# Altium PCB task1.PcbDoc (part 2 of 2)
Units mil, origin at the board's own origin, x right, y up, seen from the top; angles counter-clockwise.
Board outline 13280 x 12290 mil, 2 copper layers (Top Layer, Bottom Layer); 143 components, 138 nets, 540 pads, 213 vias.
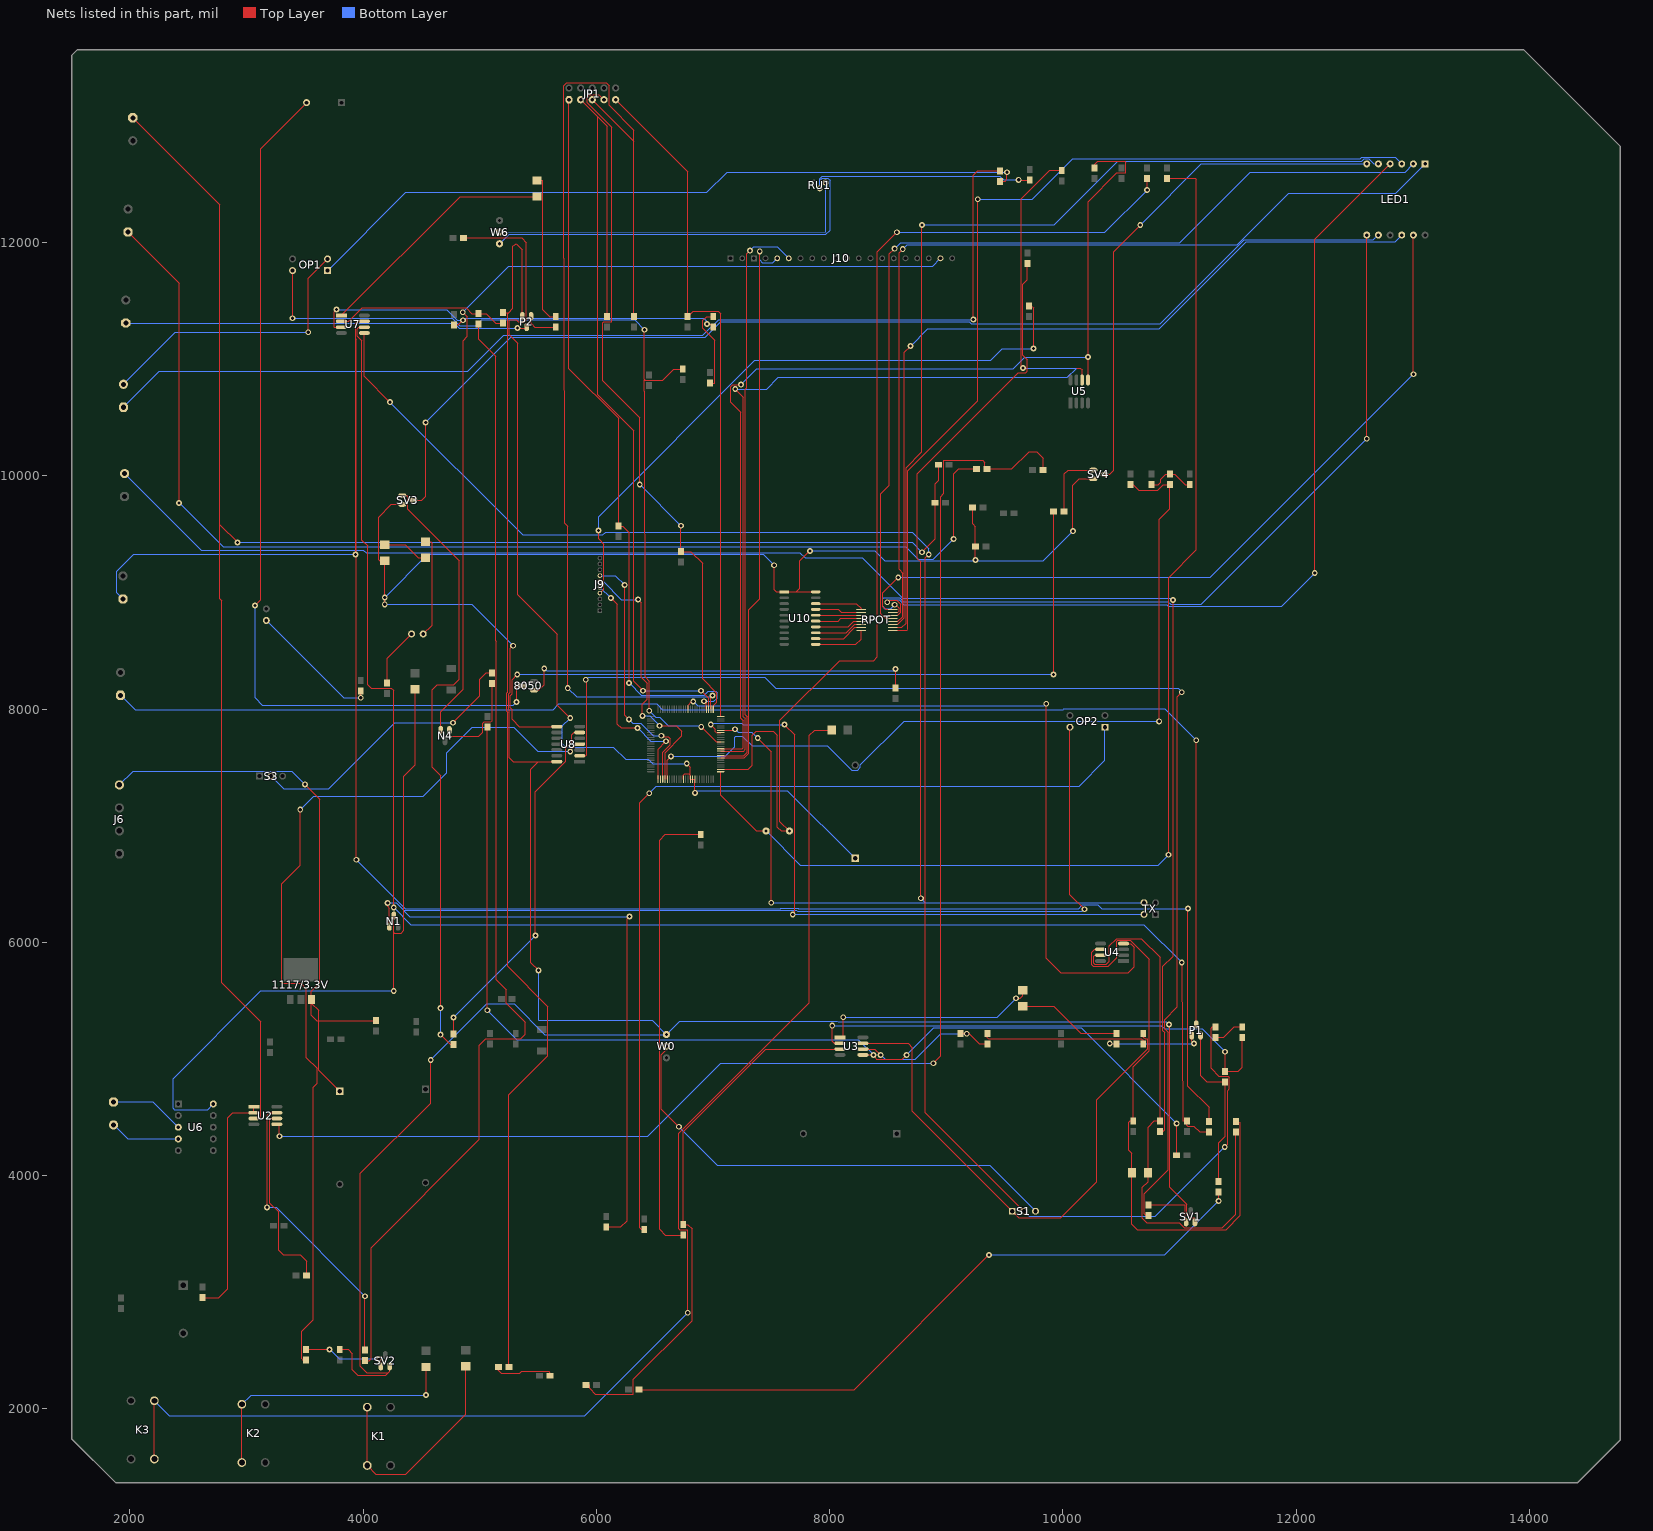
[diagram p2: the nets of this part, all layers, seen from the top]

## Via types
v1: diameter 50, hole 28, Top Layer to Bottom Layer, 213 vias

## Nets (pads, with @x,y where several pads share a name; then routed paths per layer and width w, separated by ;. In a path a pad name is that pad's centre, name@x,y a point inside that pad or via, vN(x,y) a via of type N, cw(c..) or ccw(c..) an arc to the next point about the centre after c; other vN are vias at no path point) (continued)
LED23: LED1.8 SV3.3 | length 9604.1
  Top Layer w5: SV3.3@4430,9792 4504,9792 4536,9824 v1(4536,10458)
  Bottom Layer w5: v1(4536,10458) 5266.99,11188.99 6934.84,11188.99 7067.85,11322 9195,11322 9214.54,11302.46 10834.77,11302.46 11554.81,12022.5 12662.5,12022.5 LED1.8@12705,12065
LED24: LED1.6 SV4.3 | length 4451.4
  Top Layer w5: SV4.3@10355,10012 10400,10012 10436,10048 10436,11923 v1(10663.58,12150.58)
  Bottom Layer w5: v1(10663.58,12150.58) 11188,12675 LED1.6@12605,12675
Net1117/3.3V_3: 1117/3.3V.3 C13.1 C14.1 J6.4 | length 5176.6
  Top Layer w5: v1(3501,7355) 3628,7228 3628,5652 3556.22,5580.22 1117/3.3V.3@3556.22,5511.46 1117/3.3V.3@3556.22,5479.78 ; C13.1@3800,4725 3620,4905 3620,5330 ; C14.1@4110,5330 3620,5330 ; 1117/3.3V.3@3556.22,5479.78 3556.22,5376 3602.22,5330 3620,5330 ; 1117/3.3V.3@3556.22,5479.78 3620,5416 3620,5330
  Bottom Layer w5: J6.4@1910,7350.1 2027.9,7468 3388,7468 v1(3501,7355)
Net8050_1: 8050.1 R54.2 | length 3439.4
  Top Layer w5: 8050.1@5464.81,8161.81 5504,8161.81 5553,8210.81 v1(5553,8349) ; R54.2@8565,8180 v1(8565,8344.72)
  Bottom Layer w5: v1(5553,8349) 5574.42,8327.58 8547.86,8327.58 v1(8565,8344.72)
Net8050_3: 8050.3 LS1.2 | length 7753.4
  Top Layer w5: v1(3073,8889) 3121,8937 3121,12806 LS1.2@3515,13200 ; v1(5315,8062) 5315,8188.81 5326,8199.81 8050.3@5369.81,8199.81
  Bottom Layer w5: v1(3073,8889) 3073,8096 3136,8033 5286,8033 v1(5315,8062)
Net_43: ?.43 TX.2 | length 5450.8
  Top Layer w5: v1(6980,7868) 7020,7828 7020,7808 7030.2,7797.8 ?.43@7065,7797.8 ; v1(7612,7868) 7699,7781 7699,6256 v1(7683,6240)
  Bottom Layer w5: v1(6980,7868) 6992.5,7880.5 7245,7880.5 7257.5,7868 v1(7612,7868) ; v1(7683,6240) TX.2@10695,6240
Net_44: ?.44 R27.2 TX.4 | length 10978.2
  Top Layer w5: ?.44@7065,7817.48 7178.48,7817.48 v1(7189,7828) ; v1(7383,7751.5) 7499,7635.5 v1(7499,6340) ; v1(8782,6379) 8782,9262.33 8753,9291.33 8753,10020 9617,10884 9683,10884 9695,10896 9695,10996 9657,11034 9657,11643 9695.18,11681.18 R27.2@9695.18,11820.01
  Bottom Layer w5: v1(7189,7828) 7216.5,7800.5 7334,7800.5 v1(7383,7751.5) ; v1(7499,6340) 8821,6340 ; v1(8782,6379) 8821,6340 ; TX.4@10695,6340 8821,6340
Net_50: ?.50 JP1.9 R47.1 | length 5882.7
  Top Layer w5: JP1.9@6165,13225 6782.03,12607.97 R47.1@6782.03,11365 6783,11365 6830,11412 7045,11412 7065,11392 ?.50@7065,7935.59
Net_51: ?.51 JP1.7 R48.1 | length 6046.2
  Top Layer w5: JP1.7@6065,13225 6021,13269 5942,13269 5921,13248 5921,13197 6130,12988 6130,11322 6064,11322 6054,11312 6054,10817 6371,10500 v1(6371,9926) ; v1(6725,9572) R48.1@6725,9350 6811,9350 6910,9251 6910,8260 7033.5,8136.5 7033.5,8060.99 7002.01,8029.5 ?.51@7002.01,7998.58
  Bottom Layer w5: v1(6371,9926) v1(6725,9572)
Net_52: ?.52 JP1.5 R49.1 | length 9560.5
  Top Layer w5: v1(5755,8180) 5755,9570 5725,9600 5721,11864 5721,13346 5744,13369 6084,13369 6109,13344 6109,13177 6322.03,12963.97 6322.03,12867.97 ; JP1.5@5965,13225 6322.03,12867.97 ; R49.1@6322.03,11365 6322.03,12867.97 ; ?.52@6982.32,7998.58 6982.32,8103.64 v1(6996,8117.32)
  Bottom Layer w5: v1(5755,8180) 5830.5,8104.5 6983.18,8104.5 v1(6996,8117.32)
Net_53: ?.53 JP1.3 R50.1 | length 7720.1
  Top Layer w5: JP1.3@5865,13225 6011,13079 ; R50.1@6092.03,11365 6092.03,12997.97 6011,13079 ; v1(6400,8158) 6320,8238 6320,10385 6011,10694 6011,13079 ; v1(6897.5,8158) 6962.64,8092.86 ?.53@6962.64,7998.58
  Bottom Layer w5: v1(6400,8158) v1(6897.5,8158)
Net_54: ?.54 JP1.1 R51.1 | length 6301.8
  Top Layer w5: JP1.1@5765,13225 5765,10918 6190,10493 R51.1@6190,9570 6224,9570 6280,9514 v1(6280,8224) ; v1(6922,8067) 6942.95,8046.05 ?.54@6942.95,7998.58
  Bottom Layer w5: v1(6280,8224) 6384,8120 6923,8120 6958,8155 7024,8155 7034,8145 7034,8093 7008,8067 v1(6922,8067)
NetC1_1: C1.1 J1.1 R1.2 U2.3 | length 16014.4
  Top Layer w5: J1.1@2025,13070 2772,12323 2772,9580 ; v1(2923,9429) 2772,9580 ; U2.3@3063.15,4490 3112,4490 3123,4501 3123,5319 2787,5655 2787,8931 2772,8946 2772,9580 ; v1(8791,9345) 8905,9459 R1.2@8905,9770 8905,9933 8934.99,9962.99 C1.1@8934.99,10095.18
  Bottom Layer w5: v1(2923,9429) 8707,9429 v1(8791,9345)
NetC3_1: C3.1 R4.2 U2.5 | length 12297.1
  Top Layer w5: U2.5@3260,4440 3282,4440 v1(3282,4338) ; v1(8889,4963) 8952,5026 8952,9822 8979,9849 8979,10133 9312,10133 9331,10114 9331,10060 R4.2@9350,10060 9563,10060 9711,10208 9775,10208 9830,10153 C3.1@9830,10050
  Bottom Layer w5: v1(3282,4338) 6442,4338 7067,4963 v1(8889,4963)
NetC7_1: C7.1 R7.1 R8.2 | length 417.8
  Top Layer w5: C7.1@10760,9925 10816,9925 10838,9947 10838,9973 10880,10015 R8.2@10917.97,10015 10957,10015 11047,9925 R7.1@11087.97,9925
NetC17_1: C17.1 R29.2 U3.5 | length 9330.9
  Top Layer w5: v1(5065,5418) R29.2@5065,7845 ; U3.5@8285,5035 v1(8376,5035) 8399,4997.5 8622.5,4997.5 v1(8660,5035) ; C17.1@10975,4175 v1(10975,4447)
  Bottom Layer w5: v1(5065,5418) 5318,5165 8246,5165 v1(8376,5035) ; v1(8660,5035) 8892,5267 10155,5267 v1(10975,4447)
NetD1_1: D1.1 N1.3 U6.10 | length 5676
  Top Layer w5: v1(4263,5584) 4263,6085 ; N1.3@4263,6230 4263,6085 ; D1.1@4444.81,8169.81 4444.81,7521 4349,7425.19 4349,6103 4326,6080 4268,6080 4263,6085
  Bottom Layer w5: U6.10@2715,4615 2666,4566 2382,4566 2372,4576 2372,4832 3124,5584 v1(4263,5584)
NetD2_1: D2.1 R37.2 | length 899
  Top Layer w5: D2.1@9655,5451.89 9921.11,5451.89 10153,5220 R37.2@10457.97,5220
NetD2_2: D2.2 U3.1 | length 1862.9
  Top Layer w5: U3.1@8088.15,5185 8116,5185 v1(8116,5358) ; v1(9598,5521) 9632,5521 9655,5544 D2.2@9655,5590
  Bottom Layer w5: v1(8116,5358) 9435,5358 v1(9598,5521)
NetD3_1: D3.1 R11.1 | length 1296.2
  Top Layer w5: D3.1@5490,12533.11 5542,12533.11 5542,11423 5600,11365 R11.1@5652.03,11365
NetD3_2: D3.2 U7.1 | length 2099.3
  Top Layer w5: U7.1@3813.15,11375 4833.15,12395 D3.2@5490,12395
NetD5_1: D5.1 R25.2 R26.2 U4.6 | length 5134.6
  Top Layer w5: U4.6@10323.15,5940 10272,5940 10248.41,5916.41 10248.41,5808 10259.65,5796.75 10386.65,5796.75 10460,5870.11 10460,6008 10470.25,6018.25 10576.75,6018.25 10740.47,5854.53 10740.47,5072.5 10602.97,4935 R25.2@10602.97,4470 10576,4470 10565,4459 10565,4216.89 10591.89,4190 D5.1@10591.89,4025 10591.89,3583 10637.2,3537.69 11398.39,3537.69 11521,3660.3 11521,4456 R26.2@11482.97,4465
NetD5_2: D5.2 R24.2 R26.1 U4.7 | length 4849.6
  Top Layer w5: U4.7@10323.15,5890 10272,5890 10263.41,5881.41 10263.41,5820.35 10272,5811.75 10370.65,5811.75 10398,5839.11 10398,5969 10462.25,6033.25 10672.75,6033.25 10832.97,5873.03 R24.2@10832.97,4470 10784,4470 10730,4416 D5.2@10730,4025 10730,3949 10682,3901 10682,3635 10720,3597 10997,3597 11041.31,3552.69 11365.69,3552.69 11482.97,3669.97 R26.1@11482.97,4375
NetD8_1: D8.1 K1.1 K1.3 | length 1997.7
  Top Layer w5: K1.3@4035,2015 K1.1@4035,1515 4109,1441 4365,1441 4879.81,1955.81 D8.1@4879.81,2364.81
NetD9_1: D9.1 K2.1 K2.3 | length 2353.3
  Top Layer w5: K2.1@2960,1540 K2.3@2960,2040 ; v1(4539.81,2119) D9.1@4539.81,2359.81
  Bottom Layer w5: K2.3@2960,2040 3039,2119 v1(4539.81,2119)
NetD10_1: D10.1 K3.1 K3.3 | length 11186.4
  Top Layer w5: K3.3@2210,1570 K3.1@2210,2070 ; v1(6783,2825) 6783,3535 6716,3535 6707,3544 6707,4362 7827,5482 7827,7776 7871,7820 D10.1@8016.89,7820
  Bottom Layer w5: K3.1@2210,2070 2339,1941 5899,1941 v1(6783,2825)
NetD11_1: D11.1 D13.2 | length 871
  Top Layer w5: D11.1@4515,8645 4591,8721 4591,9424 4580,9435 D13.2@4535,9435
NetD11_2: D11.2 R46.2 | length 507
  Top Layer w5: R46.2@4205,8225 4205,8435 D11.2@4415,8645
NetD12_1: D12.1 R45.2 | length 1142.7
  Top Layer w5: v1(3980,8097) 3980.18,8097.18 R45.2@3980.18,8155.01
  Bottom Layer w5: D12.1@3170,8760 3833,8097 v1(3980,8097)
NetD13_1: D13.1 D14.2 | length 396.9
  Top Layer w5: D14.2@4185,9410 4360,9410 4473.11,9296.89 D13.1@4535,9296.89
NetJ2_1: J2.1 R4.1 | length 10189.3
  Top Layer w5: J2.1@1985,12090 2422,11653 v1(2422,9768) ; v1(9063,9459.5) 9063,10016 9107,10060 R4.1@9260,10060
  Bottom Layer w5: v1(2422,9768) 2799,9391 7793,9391 7796,9394 8651,9394 8758.5,9286.5 8890,9286.5 v1(9063,9459.5)
NetJ3_1: J3.1 P2.3 | length 3462.8
  Top Layer w5: v1(5322.5,11267.5) 5323,11267 5402,11267 P2.3@5402,11275
  Bottom Layer w5: J3.1@1965,11310 4782,11310 4824.5,11267.5 v1(5322.5,11267.5)
NetJ4_1: J4.1 R18.1 | length 9078.6
  Top Layer w5: v1(9232,11340) 9232,12576 9271,12615 R18.1@9460,12615
  Bottom Layer w5: J4.1@1945,10588.15 2253.85,10897 4897,10897 5203.99,11203.99 6910.99,11203.99 7047,11340 v1(9232,11340)
NetJ4_2: J4.2 OP1.2 | length 2467.1
  Top Layer w5: v1(3530,11231) 3530,11695 OP1.2@3695,11860
  Bottom Layer w5: J4.2@1945,10785 2391,11231 v1(3530,11231)
NetJ5_2: J5.2 R24.1 | length 14067.1
  Top Layer w5: R24.1@10832.97,4380 10859,4380 10871,4392 10871,5228.04 10856,5243.04 10856,5795 10944,5883 v1(10944,8935)
  Bottom Layer w5: J5.2@1955,10020 2610.76,9364.24 4002.42,9364.24 4024.48,9342.19 7742.78,9342.19 7789.17,9295.8 8279.87,9295.8 8624.67,8951 10928,8951 v1(10944,8935)
NetJ7_1: J7.1 R43.2 U7.7 | length 18130.6
  Top Layer w5: v1(3935,9326) 3935,11175.01 ; v1(3942,6708) 3942,11168.01 3935,11175.01 ; U7.7@4010,11325 3952,11325 3935,11308 3935,11175.01 ; v1(11072,6290) 11072,4767.97 11252.97,4587 R43.2@11252.97,4465
  Bottom Layer w5: J7.1@1940,8945 1888,8997 1888,9181 2033,9326 v1(3935,9326) ; v1(3942,6708) 4360,6290 7579.3,6290 7581.8,6292.5 7728.77,6292.5 7731.27,6290 10134.35,6290 10166.84,6322.49 10300.5,6322.49 10332.99,6290 v1(11072,6290)
NetJ8_1: J8.1 P1.3 | length 11867.3
  Top Layer w5: P1.3@11142.96,5295.2 P1.3@11142.96,5310 ; P1.3@11143,5310 v1(11143,7733)
  Bottom Layer w5: J8.1@1920,8118.15 2044.22,7993.93 3110,7993.93 3112.07,7996 5629.44,7996 5677.94,8044.5 6515.5,8044.5 6564,7996 10002.97,7996 10009,8002.03 10873.97,8002.03 v1(11143,7733)
NetJ9_4: J9.4 R44.1 | length 5410
  Top Layer w5: v1(6018,9532) 6018,9460 6063,9415 6063,9028 J9.4@6030,8995 ; R44.1@9710,11455 9710,11450 9738,11450 9748,11440 v1(9748,11091)
  Bottom Layer w5: v1(6018,9532) 6018,9649.5 7359.5,10991 9380,10991 9480,11091 v1(9748,11091)
NetJ10_19: J10.19 N4.2 | length 7981.4
  Top Layer w5: N4.2@4665,7820 4665,7979 4857,8171 4857,11160 4893.5,11196.5 4893.5,11363.5 v1(4854,11403)
  Bottom Layer w5: v1(4854,11403) 5249,11798 8883,11798 J10.19@8950,11865
NetJ15_1: J15.1 U6.3 | length 644.8
  Bottom Layer w5: J15.1@1860,4631.85 2198.15,4631.85 U6.3@2415,4415
NetJ15_2: J15.2 U6.4 | length 604.7
  Bottom Layer w5: J15.2@1860,4435 1980,4315 U6.4@2415,4315
NetLED1_1: LED1.1 RPOT.12 | length 8058.8
  Top Layer w5: RPOT.12@8540.83,8752.2 8584,8752.2 8625.5,8793.7 8625.5,9166.59 8595,9197.09 8595,11912 v1(8627,11944)
  Bottom Layer w5: v1(8627,11944) 8666.5,11983.5 11492.5,11983.5 11934,12425 12855,12425 LED1.1@13105,12675
NetLED1_2: LED1.2 RPOT.13 | length 8045.2
  Top Layer w5: RPOT.13@8540.83,8777.8 8480,8777.8 8440,8817.8 8440,9848 8512,9920 8512,11903 v1(8557,11948)
  Bottom Layer w5: v1(8557,11948) 8607.5,11998.5 11002,11998.5 11606.5,12603 12933,12603 LED1.2@13005,12675
NetLED1_3: LED1.3 RPOT.9 | length 7877.7
  Top Layer w5: RPOT.9@8540.83,8675.43 8663.03,8675.43 8670.5,8682.91 8670.5,10043.5 9270,10643 v1(9270,12371)
  Bottom Layer w5: v1(9270,12371) 9738,12371 10085,12718 12547.5,12718 12562,12732.5 12847.5,12732.5 LED1.3@12905,12675
NetLED1_4: LED1.4 RPOT.14 | length 7876.6
  Top Layer w5: v1(8493,8916) 8509.5,8932.5 8576,8932.5 8609.67,8898.83 8609.67,8829.05 8584,8803.39 RPOT.14@8540.83,8803.39 ; v1(12159,9167) 12159,12029 LED1.4@12805,12675
  Bottom Layer w5: v1(8493,8916) 8513,8936 8594.67,8936 8634.67,8896 10891.5,8896 10905,8882.5 11874.5,8882.5 v1(12159,9167)
NetLED1_5: LED1.5 RPOT.10 | length 7766.1
  Top Layer w5: RPOT.10@8540.83,8701.02 8619.69,8701.02 8655.5,8736.83 8655.5,10069.5 8791,10205 v1(8791,12151)
  Bottom Layer w5: v1(8791,12151) 9926,12151 10472,12697 12563,12697 12583.5,12717.5 12624,12717.5 12666.5,12675 LED1.5@12705,12675
NetLED1_7: LED1.7 RPOT.15 | length 6832.1
  Top Layer w5: RPOT.15@8540.83,8828.98 8583,8828.98 8594.67,8840.64 8594.67,8864 8563.67,8895 v1(8557,8895) ; v1(12605,10318) LED1.7@12605,12065
  Bottom Layer w5: v1(8557,8895) 8524.5,8862.5 8473,8862.5 8455.5,8880 8455.5,8945.5 8464,8954 8599.67,8954 8632.67,8921 10899,8921 10922.5,8897.5 11184.5,8897.5 v1(12605,10318)
NetLED1_10: LED1.10 RPOT.11 | length 7080
  Top Layer w5: RPOT.11@8540.83,8726.61 8583.28,8726.61 8640.5,8783.83 8640.5,11059.5 v1(8694,11113)
  Bottom Layer w5: v1(8694,11113) 8843,11262 10825,11262 11570.5,12007.5 12847.5,12007.5 LED1.10@12905,12065
NetLED1_11: LED1.11 RPOT.16 | length 6733.3
  Top Layer w5: RPOT.16@8540.83,8854.57 8480,8854.57 8455,8879.57 8455,8996 v1(8588,9129) ; v1(13005,10871) LED1.11@13005,12065
  Bottom Layer w5: v1(8588,9129) 11263,9129 v1(13005,10871)
NetN1_1: N1.1 OP2.4 R22.1 | length 12701.7
  Top Layer w5: v1(4210,6338) 4210,6308 4225,6293 N1.1@4225,6135 ; R22.1@6085,3560 6208,3560 6263,3615 6263,6201 v1(6283,6221) ; OP2.4@10060,7845 10060,6409 v1(10185,6284)
  Bottom Layer w5: v1(4210,6338) 4282,6338 ; v1(6283,6221) 4399,6221 4282,6338 ; v1(10185,6284) 10166,6265 7726.5,6265 7714,6277.5 7648.5,6277.5 7646,6275 4347,6275 4284,6338 4282,6338
NetN4_1: N4.1 R53.2 | length 832.7
  Top Layer w5: N4.1@4740,7820 4740,7776 4748,7768 4992,7768 5027,7803 5027,7880 5037,7890 5096,7890 5105,7899 R53.2@5105,8220
NetOP1_1: OP1.1 R18.2 | length 6302.8
  Top Layer w5: R18.2@9460,12525 9504,12525 9520,12541 v1(9520,12603)
  Bottom Layer w5: OP1.1@3695,11760 4365,12430 6948,12430 7121,12603 v1(9520,12603)
NetOP2_1: OP2.1 R23.1 | length 8111.9
  Top Layer w5: R23.1@6410,3540 6384,3540 6372,3552 6372,7198 v1(6453,7279)
  Bottom Layer w5: v1(6453,7279) 6512,7338 10138,7338 10360,7560 OP2.1@10360,7845
NetP1_1: P1.1 R37.1 | length 852.9
  Top Layer w5: v1(10402,5133) 10405,5130 R37.1@10457.97,5130 ; P1.1@11104.96,5200.2 11104.96,5151.04 v1(11123,5133)
  Bottom Layer w5: v1(10402,5133) v1(11123,5133)
NetP1_2: P1.2 R38.1 R40.2 | length 1452.5
  Top Layer w5: P1.2@11179.96,5200.2 11179.96,4857.04 11232,4805 R38.1@11390,4805 11390,4339 11335,4284 R40.2@11335,3950
NetP2_1: P2.1 R11.2 | length 288.3
  Top Layer w5: P2.1@5440,11370 5440,11307 5472,11275 R11.2@5652.03,11275
NetP2_2: P2.2 R10.1 R12.2 | length 10638
  Top Layer w5: R12.2@5200,11400 5230,11400 ; R10.1@5250,2360 5250,4694 5583,5027 5583,5450 5238,5795 5238,7973.82 5232,7979.82 5232,8138.82 5238,8144.82 5238,11392 5230,11400 ; P2.2@5365,11370 5365,11937 5312,11990 5283,11968 5283,11435 5248,11400 5230,11400
NetR2_1: R2.1 U2.1 U2.2 | length 2006.1
  Top Layer w5: R2.1@2622.97,2955 2762,2955 2838,3031 2838,4498 2880,4540 U2.2@3063.15,4540 U2.1@3063.15,4590
NetR5_1: R5.1 U2.6 | length 1615.1
  Top Layer w5: U2.6@3260,4490 3208,4490 3200,4482 3200,3765.03 3275,3690.03 3275,3360 3315,3320 3459,3320 3515,3264 R5.1@3515,3145
NetR9_1: R9.1 R10.2 | length 519.1
  Top Layer w5: R10.2@5160,2360 5160,2330 5182.5,2307.5 5342.74,2307.5 5358.24,2323 5592,2323 5600,2315 R9.1@5600,2285
NetR12_1: R12.1 R16.1 U7.2 | length 1488.7
  Top Layer w5: U7.2@3813.15,11325 3878,11325 3993.5,11440.5 4882.5,11440.5 4933,11390 R16.1@4990,11390 5056,11390 5136,11310 R12.1@5200,11310
NetR13_1: R13.1 R14.2 U7.3 | length 3678.1
  Top Layer w5: v1(3771,11426) 3753,11408 3753,11275 U7.3@3813.15,11275 ; R13.1@4780,11295 4817.19,11295 v1(4856,11333.81) ; v1(6949,11301) 7002.03,11301 R14.2@7002.03,11275
  Bottom Layer w5: v1(3771,11426) 4716,11426 4808.19,11333.81 v1(4856,11333.81) 4873.69,11351.5 6920.5,11351.5 6971,11301 v1(6949,11301)
NetR14_1: R14.1 R15.2 | length 721.3
  Top Layer w5: R15.2@6975.18,10795.01 7013,10795.01 7013,11162 6911.5,11263.5 6911.5,11332.5 6944,11365 R14.1@7002.03,11365
NetR16_2: R16.2 R17.1 | length 9814.8
  Top Layer w5: R17.1@4015,2415 4052,2415 4069,2432 4069,3383 4997,4311 4997,5120 5052,5175 5350,5175 5388,5213 5388,5317 5228,5477 5228,5595 5143,5680 5143,8580 5136,8587 5136,11025 4990,11171 R16.2@4990,11300
NetR17_2: R17.2 U2.7 | length 2497.8
  Top Layer w5: v1(3176,3728) 3176,4516 3200,4540 U2.7@3260,4540 ; R17.2@4015,2505 v1(4015,2966.39)
  Bottom Layer w5: v1(3176,3728) 3253.39,3728 v1(4015,2966.39)
NetR30_2: R30.2 R31.1 U3.6 | length 1290.3
  Top Layer w5: U3.6@8285,5085 8387,5085 v1(8437,5035) ; R30.2@9122.97,5220 v1@9176,5220 ; v1(9176,5216) v1@9176,5220 ; R31.1@9352.97,5130 9282,5130 9192,5220 v1@9176,5220
  Bottom Layer w5: v1(8437,5035) 8476,4996 8733,4996 8953,5216 v1(9176,5216)
NetR31_2: R31.2 R32.1 | length 1410.9
  Top Layer w5: R31.2@9352.97,5220 9352.97,5184 9361.97,5175 10672.97,5175 10687.97,5160 R32.1@10687.97,5130
NetR32_2: R32.2 S1.1 U3.7 | length 4554.4
  Top Layer w5: U3.7@8285,5135 8672,5135 8710,5097 8710,4550 S1.1@9565,3695 9622,3638 9980,3638 10290,3948 10290,4652.03 10725.47,5087.5 10725.47,5172.5 10704,5172.5 10687.97,5188.53 R32.2@10687.97,5220
NetR33_1: R33.1 R34.2 | length 267.3
  Top Layer w5: R33.1@11307.97,5185 11377,5185 11467,5275 R34.2@11537.97,5275
NetR33_2: R33.2 S1.2 U7.5 | length 15064.3
  Top Layer w5: U7.5@4010,11225 4010,10852 v1(4230,10632) ; v1(8850,9326) 8820,9296 8820,4540 S1.2@9665,3695 ; R33.2@11307.97,5275 11280,5275 11270,5265 11270,4919 11337,4852 11416,4852 11428,4840 11428,4745 11411,4728 11411,4270 v1(11387,4246)
  Bottom Layer w5: v1(4230,10632) 5367.63,9494.37 6055.92,9494.37 6079.55,9518 8707.25,9518 8850,9375.25 v1(8850,9326) ; S1.2@9665,3695 9710,3650 10791,3650 v1(11387,4246)
NetR34_1: R34.1 R38.2 U3.2 | length 4253.6
  Top Layer w5: v1(8022,5286) 8022,5152 8039,5135 U3.2@8088.15,5135 ; v1(11390,5062) R38.2@11390,4895 11504.97,4895 11537.97,4928 R34.1@11537.97,5185
  Bottom Layer w5: v1(8022,5286) 10843.04,5286 10871,5258.04 11193.96,5258.04 v1(11390,5062)
NetR35_1: R35.1 R36.2 | length 3932.8
  Top Layer w5: R35.1@6745,3490 6592,3490 6541.5,3540.5 6541.5,6874.5 6592,6925 R36.2@6895,6925
NetR35_2: R35.2 R41.1 U3.3 | length 4607
  Top Layer w5: R41.1@5910,2205 5941,2205 5941,2176 5990,2127 6318,2127 6318,2255 6821,2758 6821,3543 6784,3580 R35.2@6745,3580 6745,4378 7452,5085 U3.3@8088.15,5085
NetR39_2: R39.2 R40.1 | length 5717.2
  Top Layer w5: R39.2@6365,2165 8211,2165 v1(9366,3320) ; v1(11335,3783) R40.1@11335,3860
  Bottom Layer w5: v1(9366,3320) 10872,3320 v1(11335,3783)
NetR42_2: R42.2 R43.1 U7.6 | length 13854.5
  Top Layer w5: U7.6@4010,11275 3963,11275 3950.26,11262.26 3950.26,11196 3990,11156.26 3990,9450 4038,9402 4038,8210 4068,8180 4242,8180 4262,8160 v1(4262,6300) ; v1(11018,5828) 11028,4470 R42.2@11062.97,4470 11062.97,4432 11071.97,4423 11123,4423 11171,4375 R43.1@11252.97,4375
  Bottom Layer w5: v1(4262,6300) 4410,6152 10694,6152 v1(11018,5828)
NetR53_1: R53.1 S3.2 | length 2434.8
  Top Layer w5: v1(4770,7883) 5000,8113 5000,8256 5054,8310 R53.1@5105,8310
  Bottom Layer w5: S3.2@3210,7425 3318,7317 3707,7317 4273,7883 v1(4770,7883)
NetRL1_1: RL1.1 U8.8 | length 6820.7
  Top Layer w5: v1(5322,8297) 5277,8252 5277,8129.82 5262,8114.82 5262,8009.82 5277,7994.82 5277,7912 5339,7850 U8.8@5660,7850 ; v1(9920,8297) RL1.1@9920,9695
  Bottom Layer w5: v1(5322,8297) v1(9920,8297)
NetRL1_2: RL1.2 SV4.1 | length 585.1
  Top Layer w5: RL1.2@10010,9695 10010,10016 10044,10050 SV4.1@10260,10050
NetRL2_1: RL2.1 U8.6 | length 3061.7
  Top Layer w5: RL2.1@4775,5215 v1(4775,5356) ; v1(5477,6058) 5477,7291 5737.11,7551.11 5737.11,7664 5790,7716.89 5790,7782 5808,7800 U8.6@5856.85,7800
  Bottom Layer w5: v1(4775,5356) v1(5477,6058)
NetRL2_2: RL2.2 SV3.1 | length 5202.6
  Top Layer w5: SV3.1@4335,9830 4382.5,9830 4382.5,9714 4823,9273.5 4823,8256 4775,8208 4635,8208 4594,8167 4594,7500 4664,7430 v1(4664,5436) ; v1(4664,5209) 4748,5125 RL2.2@4775,5125
  Bottom Layer w5: v1(4664,5209) v1(4664,5436)
NetRL3_1: RL3.1 U8.4 | length 8004.3
  Top Layer w5: v1(3461,7138) 3461,6662 3302.5,6503.5 3302.5,5658.5 3312,5649 3465,5649 3514,5600 3514,5011 3605,4920 3605,4792 3573,4760 3573,2766 3472,2665 3472,2428 3480,2420 RL3.1@3510,2420 ; v1(5775,7637) 5775,7643 5810,7678 5810,7700 U8.4@5856.85,7700
  Bottom Layer w5: v1(3461,7138) 3576,7253 4515,7253 4718,7456 4718,7628 4934,7844 5291,7844 5498,7637 v1(5775,7637)
NetRL3_2: RL3.2 SV2.1 | length 728.7
  Top Layer w5: RL3.2@3510,2510 v1(3712,2510) ; v1(4135,2428) 4151.81,2411.19 SV2.1@4151.81,2365.19
  Bottom Layer w5: v1(3712,2510) 3794,2428 v1(4135,2428)
NetRL4_1: RL4.1 U8.2 | length 10555.9
  Top Layer w5: U8.2@5856.85,7600 5909,7600 5917,7608 5917,8244 v1(5909,8252) ; RL4.1@10735,3660 10709,3660 10697,3672 10697,3846 10901,4050 10901,5228.04 10871,5258.04 10871,5338.38 10979,5446.38 10979,8105 v1(11019,8145)
  Bottom Layer w5: v1(5909,8252) 5929,8272 7443,8272 7538,8177 10987,8177 v1(11019,8145)
NetRL4_2: RL4.2 SV1.1 | length 470.9
  Top Layer w5: RL4.2@10735,3750 11046,3750 11047.31,3748.69 11047.31,3632.69 11056.81,3632.69 SV1.1@11056.81,3600.19
NetRPOT_1: RPOT.1 U10.18 | length 415.6
  Top Layer w5: U10.18@7880,8905 8228.17,8905 8269.17,8864 RPOT.1@8269.17,8854.57
NetRPOT_2: RPOT.2 U10.17 | length 400
  Top Layer w5: U10.17@7880,8855 8074,8855 8100.02,8828.98 RPOT.2@8269.17,8828.98
NetRPOT_3: RPOT.3 U10.16 | length 389.8
  Top Layer w5: U10.16@7880,8805 8074,8805 8075.61,8803.39 RPOT.3@8269.17,8803.39
NetRPOT_4: RPOT.4 U10.15 | length 398.6
  Top Layer w5: U10.15@7880,8755 8074,8755 8096.8,8777.8 RPOT.4@8269.17,8777.8
NetRPOT_5: RPOT.5 U10.14 | length 408.7
  Top Layer w5: U10.14@7880,8705 8161,8705 8208.2,8752.2 RPOT.5@8269.17,8752.2
NetRPOT_6: RPOT.6 U10.13 | length 418.8
  Top Layer w5: U10.13@7880,8655 8143.39,8655 8215,8726.61 RPOT.6@8269.17,8726.61
NetRPOT_7: RPOT.7 U10.12 | length 428.9
  Top Layer w5: U10.12@7880,8605 8118.98,8605 8215,8701.02 RPOT.7@8269.17,8701.02
NetRPOT_8: RPOT.8 U10.11 | length 483.1
  Top Layer w5: U10.11@7880,8555 8224,8555 8269.17,8600.17 RPOT.8@8269.17,8675.43
NetRU1_3: RU1.3 W6.2 | length 3219
  Bottom Layer w5: W6.2@5170,12090 7965,12091 RU1.3@7965,12515
NetS1_3: S1.3 W0.2 | length 4129.2
  Top Layer w5: W0.2@6600,5110 6600,5078 6556.5,5034.5 6556.5,4569.5 v1(6707,4419)
  Bottom Layer w5: v1(6707,4419) 7038,4088 9372,4088 S1.3@9765,3695
REF2.5V: RR0.2 RU1.2 W6.3 | length 5320.2
  Top Layer w5: v1(9620.02,12537.98) 9623,12535 RR0.2@9715,12535
  Bottom Layer w5: W6.3@5170,11990 5252,12072 7968,12072 8003,12107 8003,12534 7984,12553 7936,12553 7915,12532 ; RU1.2@7915,12465 7915,12532 ; v1(9620.02,12537.98) 9491.36,12537.98 9459.34,12570 7936,12570 7915,12549 7915,12532
RST: ?.5 C8.1 R8.1 | length 7269.6
  Top Layer w5: ?.5@6608.31,7400.16 6608.31,7563 v1(6640.31,7595) ; C8.1@10577.97,9925 10603.03,9925 10650.03,9878 10815,9878 10862,9925 R8.1@10917.97,9925 10917.97,9718.97 10825,9626 v1(10825,7895)
  Bottom Layer w5: v1(6640.31,7595) 7103.91,7595 7184.5,7675.59 7184.5,7760 7194,7769.5 7250,7769.5 7335.5,7684 7980,7684 8188,7476 8240,7476 8264,7500 8264,7521.42 8637.58,7895 v1(10825,7895)
SCL: ?.35 R20.1 U5.6 | length 8850.7
  Top Layer w5: ?.35@7065,7640.31 7261.29,7640.31 7275.5,7654.53 7275.5,7922.11 7261,7936.61 7261,10673 v1(7190,10744) ; v1(9657,10924) 9642,10939 9642,12374 9888,12620 R20.1@9990,12620 ; 10118,10924 10149,10924 10165,10908 U5.6@10165,10821.85
  Bottom Layer w5: v1(7190,10744) 7460,10744 7560,10844 10038,10844 10118,10924 v1(9657,10924)
SCLK: ?.33 J10.6 | length 4949.5
  Top Layer w5: ?.33@7065,7600.94 7261.94,7600.94 7291.25,7630.25 7291.25,7936.36 7276,7951.61 7276,10744 7288,10756 7288,11903 v1(7316,11931)
  Bottom Layer w5: v1(7316,11931) 7347.5,11962.5 7552.5,11962.5 J10.6@7650,11865
SDA: ?.36 R21.1 U5.5 | length 8869.9
  Top Layer w5: ?.36@7065,7660 7251,7660 7260,7669 7260,7899 7237,7922 7237,10546 7152,10631 7152,10766 7168,10782 v1(7239,10782) ; U5.5@10215,10821.85 v1(10215,11019) 10215,12352 10460,12597 10540,12597 10540,12688 10531,12697 10297.03,12697 10272.03,12672 R21.1@10272.03,12640
  Bottom Layer w5: v1(7239,10782) 7375,10918 9572,10918 9673,11019 v1(10215,11019)
SID: ?.32 J10.5 | length 4850.7
  Top Layer w5: ?.32@7065,7581.26 7267.26,7581.26 7306.25,7620.25 7306.25,8852.25 7400,8946 v1(7400,11925)
  Bottom Layer w5: v1(7400,11925) 7400,11851 7424,11827 7512,11827 J10.5@7550,11865
TA/MI: ?.39 OP1.4 R19.2 | length 7886.5
  Top Layer w5: v1(3395,11352) OP1.4@3395,11760 ; v1(6412,11252) 6412,10830 6424,10818 ; v1(6452.5,7986.5) 6452.5,8241.01 6413,8280.51 6412,10726 6412,10818 6424,10818 ; R19.2@6740,10915 6665,10915 6568,10818 6424,10818 ; v1(6899,7848) 7027.94,7719.06 ?.39@7065,7719.06
  Bottom Layer w5: v1(3395,11352) 4762,11352 4828,11286 4966,11286 5016.5,11336.5 6327.5,11336.5 v1(6412,11252) ; v1(6452.5,7986.5) 6506.83,7932.17 6543.4,7932.17 6617.57,7858 6889,7858 v1(6899,7848)
TCK: ?.2
TDI: ?.3 J9.7 | length 2208.8
  Top Layer w5: v1(6242,9065) 6242,7949 v1(6279,7912) ; v1(6557,7772) 6567,7762 6616,7762 6634,7744 6634,7696 6568.94,7630.94 ?.3@6568.94,7400.16
  Bottom Layer w5: J9.7@6030,9145 6162,9145 v1(6242,9065) ; v1(6279,7912) 6313,7878 6380,7878 6486,7772 v1(6557,7772)
TDO: ?.4 J9.6 | length 2303.2
  Top Layer w5: v1(6358,8939) 6383,8914 6383,8275 6437.5,8220.5 6437.5,8085 6395,8042.5 v1(6395,7942) ; v1(6541,7857) 6686.5,7857 6733.5,7810 6733.5,7771.5 6588.62,7626.62 ?.4@6588.62,7400.16
  Bottom Layer w5: J9.6@6030,9095 6059,9095 6215,8939 v1(6358,8939) ; v1(6395,7942) 6456,7942 v1(6541,7857)
TMS: ?.1 J9.5 | length 2065.6
  Top Layer w5: v1(6124,8953) 6179,8898 6179,7872 6212,7839 v1(6353,7839) ; ?.1@6529.57,7400.16 6529.57,7657.57 v1(6596,7724)
  Bottom Layer w5: J9.5@6030,9045 6122,8953 v1(6124,8953) ; v1(6353,7839) 6468,7724 v1(6596,7724)
TXD: ?.62 U4.4 | length 6427
  Top Layer w5: ?.62@6785.47,7998.58 6785.47,8032 6819.47,8066 v1(6831,8066) ; v1(9857,8046) 9857,5864 9983,5738 10560,5738 10612,5790 10612,5958 10580,5990 U4.4@10520,5990
  Bottom Layer w5: v1(6831,8066) 6870,8027 9838,8027 v1(9857,8046)
VCC: CL1.1 CL2.1 D14.1 R52.2 SV1.2 SV2.2 SV3.2 SV4.2 U8.14 U10.1 U10.20 W0.3 | length 27372.9
  Top Layer w5: R52.2@3800,2510 3872,2510 3907,2475 3907,2336 3954.38,2288.62 4192,2288.62 4215.38,2312 ; v1(4185,8898) v1(4185,8957) D14.1@4185,9271.89 4141.11,9271.89 4133,9280 4133,9647 4241,9755 SV3.2@4335,9755 ; SV2.2@4226.81,2365.19 4226.81,2323.44 4215.38,2312 ; v1(4579,4992) 4579,4621 3977,4019 3977,2367 4032,2312 4215.38,2312 ; v1(5286,8544) 5262,8520 5262,8144.82 5247,8129.82 5247,7994.82 5253,7988.82 5253,7584 5287,7550 5503,7550 ; v1(5504,5760) 5439,5825 5439,7486 5503,7550 ; U8.14@5660,7550 5503,7550 ; v1(7524,9234) 7524,9024 7543,9005 U10.1@7610,9005 7712,9005 ; v1(7831,9356) 7745,9270 7745,9038 7712,9005 ; U10.20@7880,9005 7712,9005 ; CL2.1@9225,9730 9225,9588 9250,9563 CL1.1@9250,9395 v1(9250,9279) ; v1(10086,9526) 10086,9920 10141,9975 SV4.2@10260,9975 ; v1(10909,5296) 10916,5289 10916,3902 11062.31,3755.69 11062.31,3664 11088.31,3638 11131.81,3638 SV1.2@11131.81,3600.19
  Bottom Layer w5: v1(4185,8898) 4932,8898 v1(5286,8544) ; v1(4185,8957) 4555.19,9327.19 7430.81,9327.19 v1(7524,9234) ; v1(4579,4992) 5059,5472 5295,5472 5557,5210 W0.3@6600,5210 ; v1(5504,5760) 5504,5332 6478,5332 W0.3@6600,5210 ; v1(7831,9356) 8386,9356 8470.5,9271.5 v1@9242.5,9271.5 ; v1(9250,9279) v1@9242.5,9271.5 ; v1(10086,9526) 9831.5,9271.5 v1@9242.5,9271.5 ; v1(10909,5296) 10887,5318 8073,5318 8067,5324 6714,5324 W0.3@6600,5210
VREF: ?.12 ?.15 ?.16 ?.17 C5.1 C6.2 | length 8414.7
  Top Layer w5: C6.2@4860,12040 5358,12040 5398,12000 5398,11336 5384.5,11322.5 5328.5,11322.5 5314.5,11336.5 5261.5,11336.5 5253,11328 5253,11211 5326,11138 5326,8979 5664,8641 5664,8035 v1(5776,7923) ; ?.12@6746.1,7400.16 6746.1,7435 6757.1,7446 6792,7446 6805.16,7432.84 ; v1(6775,7533) 6805.16,7502.84 6805.16,7432.84 ; v1(6844.53,7282) ?.17@6844.53,7400.16 ?.16@6824.84,7400.16 ?.15@6805.16,7400.16 6805.16,7432.84
  Bottom Layer w5: v1(5776,7923) 5709,7856 5709,7705 5739.03,7674.97 6146.03,7674.97 6251,7570 6446,7570 6483,7533 v1(6775,7533) ; v1(6844.53,7282) 6864.53,7302 7638,7302 C5.1@8220,6720
XTAL1: ?.26 C9.2 Z1.1 | length 10473.2
  Top Layer w5: ?.26@7065,7463.15 7065,7260 7370,6955 Z1.1@7455,6955 ; C9.2@10892.03,12550 11135,12550 11145,12540 11145,9367 10906,9128 v1(10906,6752)
  Bottom Layer w5: Z1.1@7455,6955 7748,6662 10816,6662 v1(10906,6752)
XTAL2: ?.27 C10.2 Z1.2 | length 9839.8
  Top Layer w5: ?.27@7065,7482.83 7300.83,7482.83 7337,7519 7337,7776 7371,7810 7517,7810 7551,7776 7551,6988 7584,6955 Z1.2@7655,6955 7574,7036 7574,7904 8086,8416 8377,8416 8409,8448 8409,11921 v1(8576,12088) ; v1(10722.03,12450.03) C10.2@10722.03,12550
  Bottom Layer w5: v1(8576,12088) 10360,12088 v1(10722.03,12450.03)
pads on no net: 1117/3.3V.4 ?.6 ?.7 ?.8 ?.9 ?.20 ?.21 ?.22 ?.23 ?.24 ?.25 ?.29 ?.30 ?.34 ?.41 ?.42 ?.45 ?.46 ?.47 ?.49 ?.55 ?.56 ?.57 ?.58 ?.59 ?.61 ?.73 ?.74 ?.75 ?.76 ?.77 ?.78 ?.79 ?.80 ?.81 ?.82 ?.83 ?.84 ?.91 ?.92 ?.93 ?.94 ?.95 ?.96 ?.98 ?.99 J5.1 J9.8 J9.10 J10.7 J10.8 J10.9 J10.10 J10.11 J10.12 J10.13 J10.14 J10.16 J10.17 J10.18 R25.1 R28.2 U4.1 U6.2 U6.5 U6.6 U6.7 U6.8 U6.9 U8.3 U8.5 U8.10 U8.11 U8.12 U8.13

## Keep-outs
Keep-Out Layer:
  lines w10: 1500,1745 1500,13170 1500,13605 1550,13655 1985,13655 13950,13655 14780,12825 14780,1735 14410,1365 1880,1365 1500,1745

## Text inside footprints (layer, text, board x,y; h text height)
C5: Top Overlay "+" at 8257.4,6740 h59.06 r270
C11: Top Overlay "+" at 8555,4397.4 h59.06
C13: Top Overlay "+" at 3762.6,4705 h59.06 r90
C15: Top Overlay "+" at 4497.6,4720 h59.06 r90
TX: Top Overlay "1" at 10815,6160 h50 r90; Top Overlay "2" at 10715,6160 h50 r90; Top Overlay "4" at 10715,6400 h50 r90; Top Overlay "3" at 10815,6400 h50 r90